# Altium PCB DC-UPS-v1.0.PcbDoc (part 4 of 8)
Units mil, origin at the board's own origin, x right, y up, seen from the top; angles counter-clockwise.
Board outline 5905.51 x 3937.01 mil, 4 copper layers (Top Layer, SIG+PWR, SIG+GND, Bottom Layer), stack 62.449 mil thick; 278 components, 138 nets, 716 pads, 780 vias.
Unrouted connection lines stored in the file: 13.
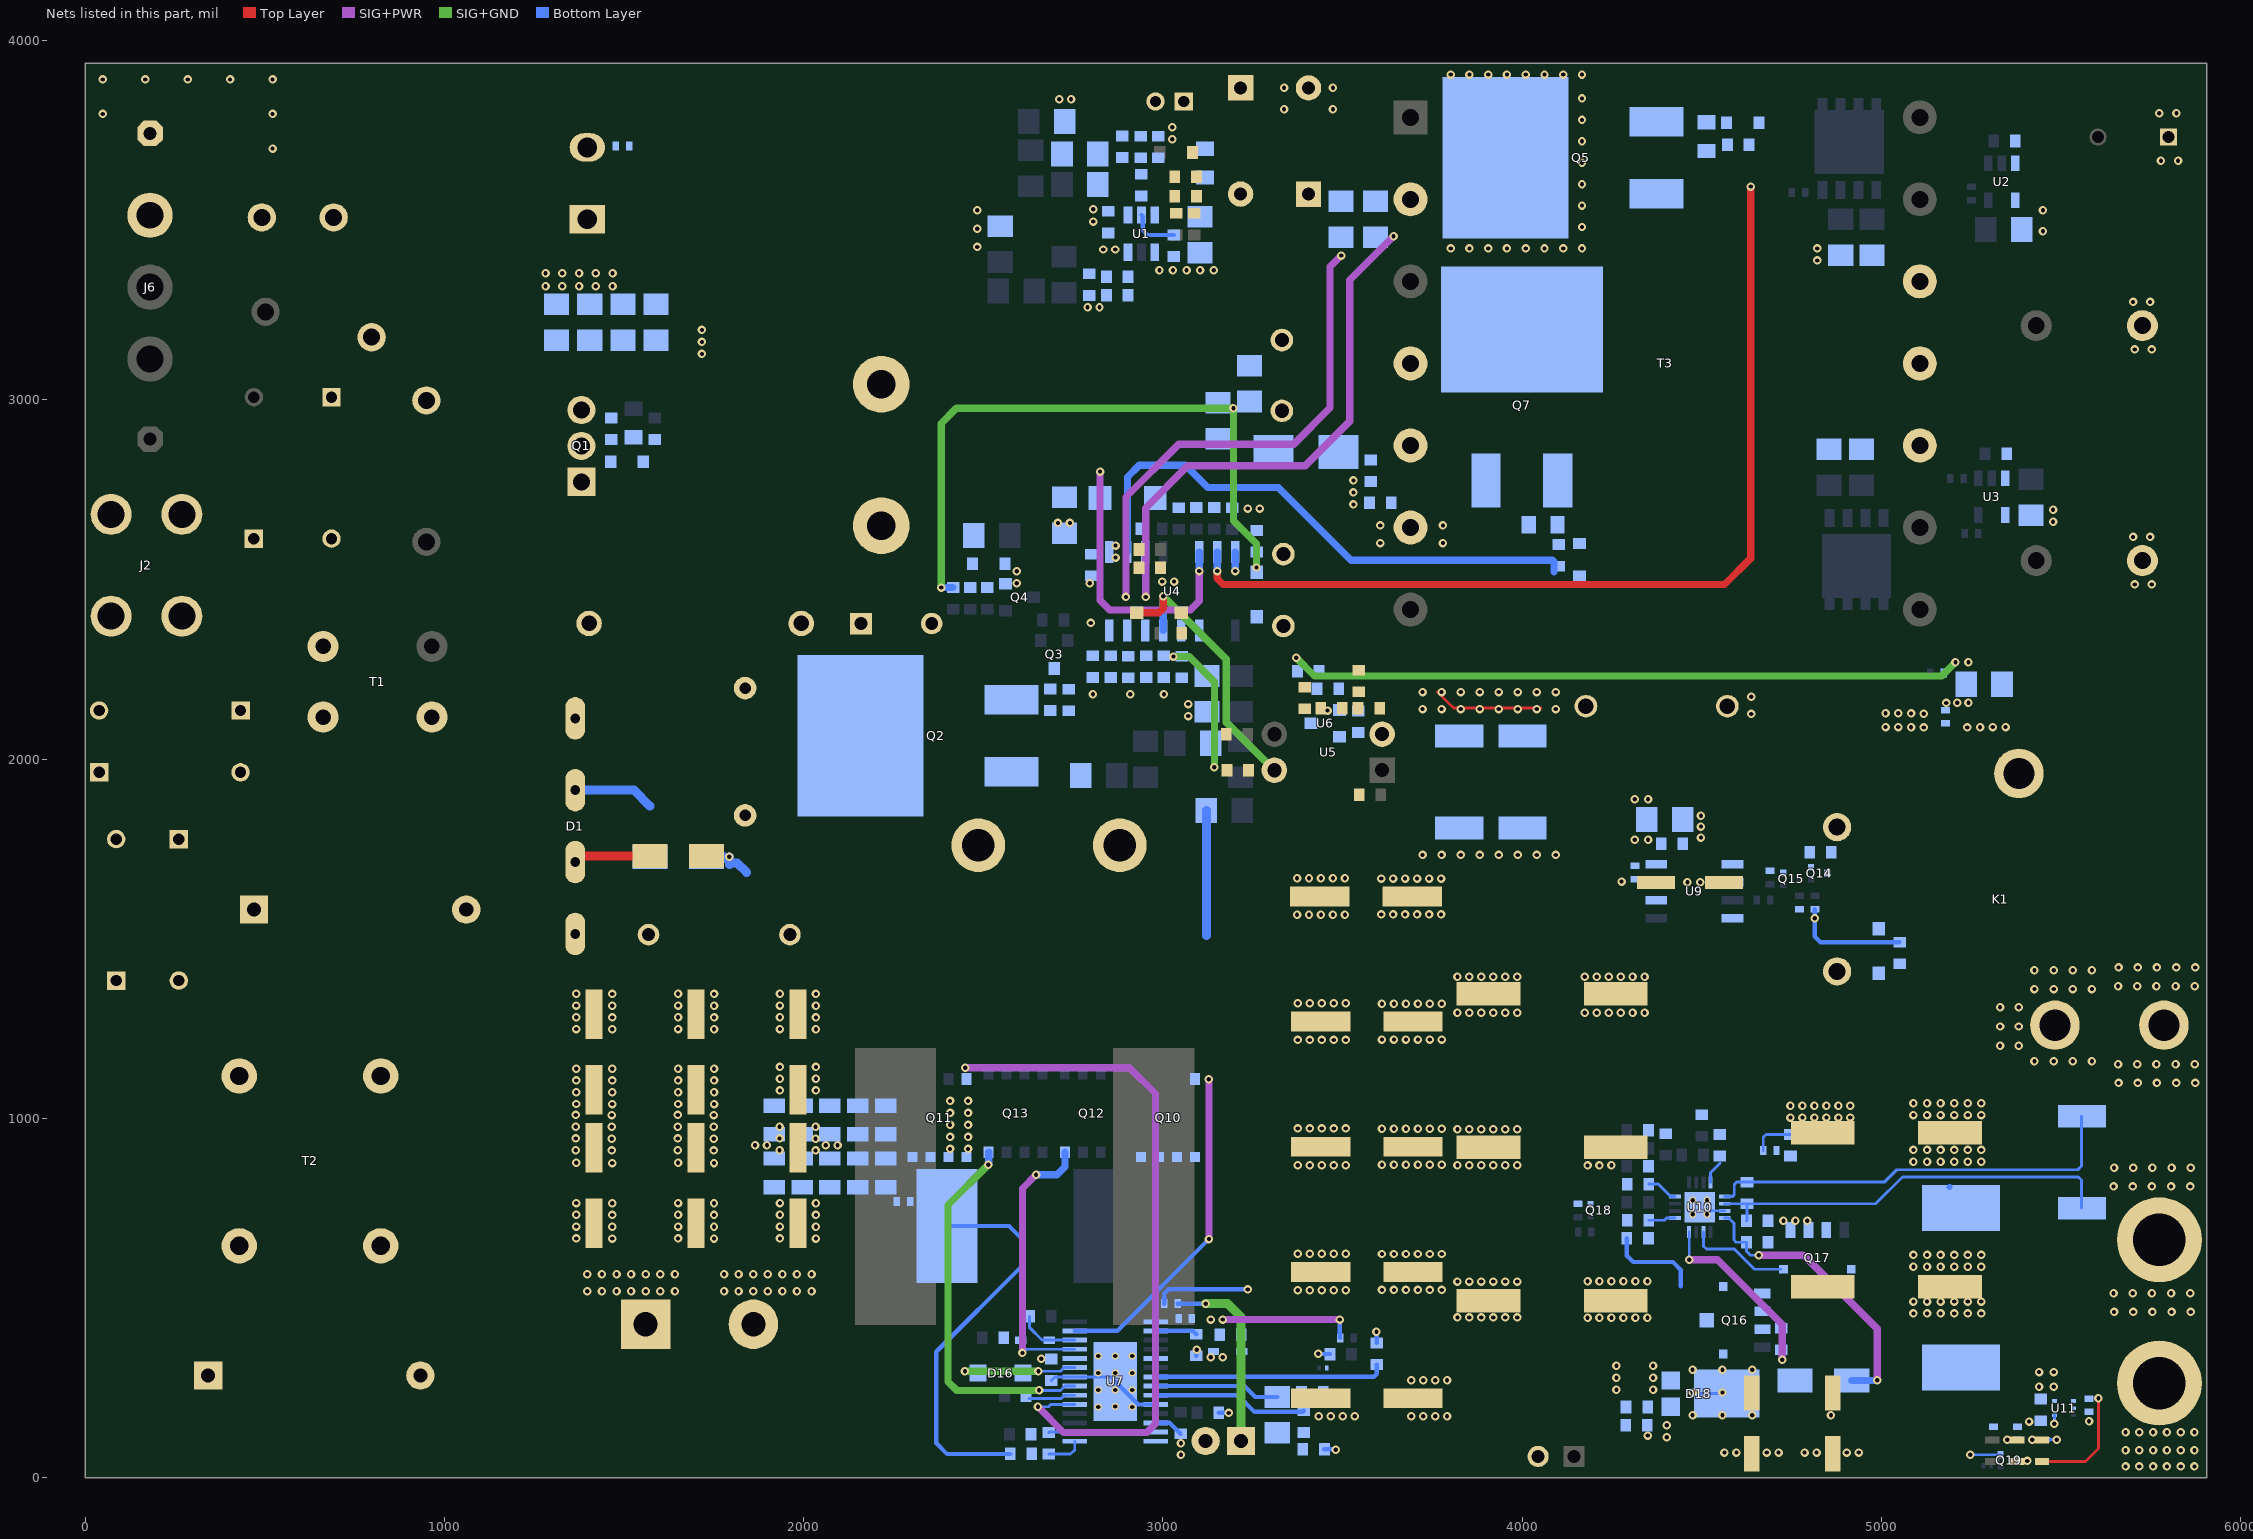
[diagram p4: the nets of this part, all layers, seen from the top]

## Part data (continued)
D5 D6 D8 D9: "100V 1V@10mA 4ns 200mA SOD-323 Switching Diodes ROHS", LCSC Part Number=C668970, Manufacturer=MCC, ComponentLink1Description=https://datasheet.ciiva.com/6367/mmdl914sod-323-6367364.pdf?src-supplier=Digikey, ComponentLink1URL=https://datasheet.ciiva.com/6367/mmdl914sod-323-6367364.pdf?src-supplier=Digikey, ComponentLink2Description=https://datasheet.ciiva.com/24097/mmdl914sod-323-24097719.pdf?src-supplier=Mouser, ComponentLink2URL=https://datasheet.ciiva.com/24097/mmdl914sod-323-24097719.pdf?src-supplier=Mouser, ComponentLink3Description=https://datasheet.ciiva.com/6367/mmdl914sod-323-6367366.pdf?src-supplier=Digikey, ComponentLink3URL=https://datasheet.ciiva.com/6367/mmdl914sod-323-6367366.pdf?src-supplier=Digikey, ComponentLink4Description=https://datasheet.ciiva.com/6367/mmdl914sod-323-6367368.pdf?src-supplier=Digikey, ComponentLink4URL=https://datasheet.ciiva.com/6367/mmdl914sod-323-6367368.pdf?src-supplier=Digikey, Item Type=Diode, Manufacturer Part Number=MMDL914-TP, Pricing="1=0.15, 10=0.108, 100=0.0585, 500=0.04594, 1000=0.03191 (USD)", RoHS=Yes, Stock=172971, Supplier=Digikey
D7: "DIODE GEN PURP 75V 150MA SOD323", Average Rectified Current=150mA, Capacitance=2pF, Forward Current=300mA, Forward Voltage=1.25V, LCSC Part Number=C60580, Manufacturer=Diodes, Max Forward Surge Current (Ifsm)=2A, Max Operating Temperature=150°C, Max Repetitive Reverse Voltage (Vrrm)=75V, Max Reverse Current=1uA, Min Operating Temperature=-65°C, Package Quantity=3000, Power Dissipation=200mW, Supplier Part Number 1=621-1N4148WS-F, Category="Rectifier Diodes", ComponentLink1Description=https://datasheet.ciiva.com/1179/ds30097-1179355.pdf?src-supplier=Element14, ComponentLink1URL=https://datasheet.ciiva.com/1179/ds30097-1179355.pdf?src-supplier=Element14, ComponentLink2Description=https://datasheet.ciiva.com/8300/ds30097-8300396.pdf?src-supplier=Avnet, ComponentLink2URL=https://datasheet.ciiva.com/8300/ds30097-8300396.pdf?src-supplier=Avnet, ComponentLink3Description=https://datasheet.ciiva.com/16199/ds30097-16199061.pdf?src-supplier=Future+Electronics, ComponentLink3URL=https://datasheet.ciiva.com/16199/ds30097-16199061.pdf?src-supplier=Future+Electronics, ComponentLink4Description=https://datasheet.ciiva.com/911/ds30097-911742.pdf?src-supplier=Digi-Key, ComponentLink4URL=https://datasheet.ciiva.com/911/ds30097-911742.pdf?src-supplier=Digi-Key, ComponentLink5Description=https://datasheet.ciiva.com/911/ds30097-911743.pdf?src-supplier=Digi-Key, ComponentLink5URL=https://datasheet.ciiva.com/911/ds30097-911743.pdf?src-supplier=Digi-Key, ComponentLink6Description=https://datasheet.ciiva.com/911/ds30097-911741.pdf?src-supplier=Digi-Key, ComponentLink6URL=https://datasheet.ciiva.com/911/ds30097-911741.pdf?src-supplier=Digi-Key, Contact Plating=Tin,Matte, Current Rating=150mA, Element Configuration=Single, Height=1mm, Item Type=Diode, Lead Free="Lead Free", Length=1.8mm, Manufacturer Part Number=1N4148WS-7-F, Max Reverse Voltage (DC)=75V, Max Surge Current=2A, Mount="Surface Mount", Number of Pins=2, Output Current=150mA, Packaging="Tape and Reel", Peak Non-Repetitive Surge Current=2A, Polarity=Standard, Power Rating=200mW, Pricing 1="1=0.19000, 10=0.17500, 50=0.17500, 100=0.09600, 500=0.05900, 1000=0.04000, 3000=0.03000, 9000=0.02600, 10000=0.02600, 24000=0.02300, 45000=0.01900 (USD)", Radiation Hardening=No, REACH SVHC="No SVHC", Recovery Time=4ns, Reverse Recovery Time=4ns, Reverse Recovery Time-Max=4ns, RoHS=Yes, RoHS Compliant=Yes, Series=-, Supplier 1=Mouser, Voltage=75V, Voltage Rating (DC)=75V, Weight=0.000173oz, Width=1.4mm
D10: "DIODE SCHOTTKY 60V 1A SMB", Average Rectified Current=1A, Case/Package=SMB, LCSC Part Number=C5268303, Manufacturer=STMicroelectronics, Max Reverse Voltage (DC)=60V, Package Quantity=1, ComponentLink1Description=https://datasheet.ciiva.com/6380/dm00058656-6380741.pdf?src-supplier=Digikey, ComponentLink1URL=https://datasheet.ciiva.com/6380/dm00058656-6380741.pdf?src-supplier=Digikey, Item Type=Diode, Manufacturer Part Number=STPS160UY, Mounting Technology="Surface Mount", Packaging="Tape and Reel", Pricing="1=0.46, 10=0.458, 50=0.458, 100=0.458, 1000=0.314, 10000=0.107 (USD)", RoHS=Yes, RoHS Compliant=Yes, Series=-, Stock=2181, Supplier=Mouser
D11: "DIODE ZENER 6.2V 500MW SOD123", Manufacturer=Diodes, Power Rating=500mW, Supplier Part Number=4181776, Voltage Rating (DC)=6.2V, Category="Zener Diodes", ComponentLink1Description=https://datasheet.ciiva.com/15142/getdatasheetpartid-61110-15142283.pdf?src-supplier=Verical, ComponentLink1URL=https://datasheet.ciiva.com/15142/getdatasheetpartid-61110-15142283.pdf?src-supplier=Verical, ComponentLink2Description=https://datasheet.ciiva.com/27052/1541132-27052413.pdf?src-supplier=Jameco, ComponentLink2URL=https://datasheet.ciiva.com/27052/1541132-27052413.pdf?src-supplier=Jameco, ComponentLink3Description=https://datasheet.ciiva.com/890/ds18010-890520.pdf?src-supplier=Digikey, ComponentLink3URL=https://datasheet.ciiva.com/890/ds18010-890520.pdf?src-supplier=Digikey, ComponentLink4Description=https://datasheet.ciiva.com/890/ds18010-890521.pdf?src-supplier=Digikey, ComponentLink4URL=https://datasheet.ciiva.com/890/ds18010-890521.pdf?src-supplier=Digikey, ComponentLink5Description=https://datasheet.ciiva.com/890/ds18010-890522.pdf?src-supplier=Digikey, ComponentLink5URL=https://datasheet.ciiva.com/890/ds18010-890522.pdf?src-supplier=Digikey, Lead Free=5697LeadFree, Manufacturer Part Number=MMSZ5234B-7-F, Pricing="3000=0.0211, 9000=0.0203, 30000=0.0195, 60000=0.0191, 120000=0.0183 (USD)", RoHS=Yes, Stock=81000, Supplier="Future Electronics"
D12: "1.65V@1A 35ns Independent Type 1A 600V DO-214AD Fast Recovery / High Efficiency Diodes ROHS", LCSC Part Number=C328590, Manufacturer="Foshan Blue Rocket Elec", Package=DO-214AD, ComponentLink1Description=LCSC, ComponentLink1URL=https://www.lcsc.com/product-detail/Fast-recovery-high-efficiency-diode_Foshan-Blue-Rocket-Elec-ES1JF_C328590.html, Item Type=Diode, Manufacturer Part Number=ES1JF
D13 D17: "DIODE GEN PURP 100V 300MA SOD123", Average Rectified Current=300mA, Current Rating=150mA, Forward Voltage=1.25V, LCSC Part Number=C83528, Manufacturer=Diodes, Max Forward Surge Current (Ifsm)=2A, Max Operating Temperature=150°C, Max Repetitive Reverse Voltage (Vrrm)=100V, Max Reverse Current=1uA, Min Operating Temperature=-65°C, Package Quantity=3000, Power Dissipation=400mW, Supplier Part Number 1=7634694, Voltage Rating (DC)=75V, Category="Rectifier Diodes", ComponentLink1Description=https://datasheet.ciiva.com/1179/1915529-1179304.pdf?src-supplier=Element14, ComponentLink1URL=https://datasheet.ciiva.com/1179/1915529-1179304.pdf?src-supplier=Element14, ComponentLink2Description=https://datasheet.ciiva.com/22695/1915529-22695239.pdf?src-supplier=Element14, ComponentLink2URL=https://datasheet.ciiva.com/22695/1915529-22695239.pdf?src-supplier=Element14, ComponentLink3Description=https://datasheet.ciiva.com/8300/ds30086-8300392.pdf?src-supplier=Avnet, ComponentLink3URL=https://datasheet.ciiva.com/8300/ds30086-8300392.pdf?src-supplier=Avnet, ComponentLink4Description=https://datasheet.ciiva.com/15219/getdatasheetpartid-110030-15219548.pdf?src-supplier=Verical, ComponentLink4URL=https://datasheet.ciiva.com/15219/getdatasheetpartid-110030-15219548.pdf?src-supplier=Verical, ComponentLink5Description=https://datasheet.ciiva.com/8303/ds30086-8303197.pdf?src-supplier=Avnet, ComponentLink5URL=https://datasheet.ciiva.com/8303/ds30086-8303197.pdf?src-supplier=Avnet, ComponentLink6Description=https://datasheet.ciiva.com/911/ds30086-911735.pdf?src-supplier=Digi-Key, ComponentLink6URL=https://datasheet.ciiva.com/911/ds30086-911735.pdf?src-supplier=Digi-Key, ComponentLink7Description=https://datasheet.ciiva.com/911/ds30086-911736.pdf?src-supplier=Digi-Key, ComponentLink7URL=https://datasheet.ciiva.com/911/ds30086-911736.pdf?src-supplier=Digi-Key, ComponentLink8Description=https://datasheet.ciiva.com/911/ds30086-911734.pdf?src-supplier=Digi-Key, ComponentLink8URL=https://datasheet.ciiva.com/911/ds30086-911734.pdf?src-supplier=Digi-Key, ComponentLink9Description=https://datasheet.ciiva.com/4435/ds30086-4435128.pdf?src-supplier=Mouser, ComponentLink9URL=https://datasheet.ciiva.com/4435/ds30086-4435128.pdf?src-supplier=Mouser, Contact Plating=Tin,Matte, Element Configuration=Single, Forward Current=150mA, Height=1.25mm, Item Type=Diode, Lead Free="Lead Free", Length=2.85mm, Manufacturer Part Number=1N4148W-7-F, Max Reverse Voltage (DC)=100V, Max Surge Current=2A, Mounting Technology="Surface Mount", Output Current=150mA, Packaging="Tape and Reel", Peak Non-Repetitive Surge Current=2A, Pins=2, Polarity=Standard, Power Rating=400mW, Pricing 1="3000=0.01840, 12000=0.01760, 45000=0.01690, 120000=0.01640, 300000=0.01560 (USD)", Radiation Hardening=No, Reach SVHC Compliant=Yes, Recovery Time=4ns, Reverse Recovery Time=4ns, Reverse Recovery Time-Max=4ns, RoHS=Yes, RoHS Compliant=Yes, Series=-, Stock 1=32931000, Supplier 1="Future Electronics", Voltage=100V, Weight=0.000353oz, Width=1.7mm
D14 D15: "35V Independent Type 500mV@200mA 200mA SOD-523F Schottky Diodes ROHS", LCSC Part Number=C3012739, Manufacturer=Comchip, ComponentLink1Description=http://www.mouser.com/ds/2/80/CDBUR0230L-RevB718340-56369.pdf?src-supplier=Mouser, ComponentLink1URL=http://www.mouser.com/ds/2/80/CDBUR0230L-RevB718340-56369.pdf?src-supplier=Mouser, Item Type=Diode, Manufacturer Part Number=CDBUR0230L-HF, Pricing="1=0.38, 10=0.263, 50=0.263, 100=0.133, 1000=0.081, 10000=0.055 (USD)", RoHS=Yes, RoHS Compliant=Yes, Stock=3840, Supplier=Mouser
D16: "20V 385mV@0.5A 500mA SOD-123 Schottky Diodes ROHS", LCSC Part Number=C22439176, Manufacturer=SINEDEVICE, Package=SOD-123, ComponentLink1Description=LCSC, ComponentLink1URL=https://www.lcsc.com/product-detail/Schottky-Diodes_SINEDEVICE-B0520W_C22439176.html, Item Type=Diode, Manufacturer Part Number=B0520W
D18: "45V Independent Type 20A 470mV@20A TO-277 Schottky Diodes ROHS", LCSC Part Number=C840773, Manufacturer=MDD, Package=TO-277, ComponentLink1Description=LCSC, ComponentLink1URL=https://www.lcsc.com/product-detail/Schottky-Diodes_MDD-Microdiode-Semiconductor-ST2045_C840773.html, Item Type=Diode, Manufacturer Part Number=ST2045
D19: "40V 500mV@2A 2A SMA(DO-214AC) Schottky Barrier Diodes (SBD) ROHS", LCSC Part Number=C2886579, Manufacturer="Guangdong Hottech", Package=SMA(DO-214AC), ComponentLink1Description=LCSC, ComponentLink1URL=https://www.lcsc.com/product-detail/Schottky-Barrier-Diodes-SBD_Guangdong-Hottech-SS24A_C2886579.html, Manufacturer Part Number=SS24A
F1: "FUSE BOARD MNT 5A 250VAC RADIAL", LCSC Part Number=C142820, Manufacturer="Littelfuse Wickmann", ComponentLink1Description=https://datasheet.ciiva.com/299/littelfuse-fuse-372-299190.pdf?src-supplier=Digikey, ComponentLink1URL=https://datasheet.ciiva.com/299/littelfuse-fuse-372-299190.pdf?src-supplier=Digikey, ComponentLink2Description=https://datasheet.ciiva.com/16298/littelfuse-fuse-372-16298798.pdf?src-supplier=Future+Electronics, ComponentLink2URL=https://datasheet.ciiva.com/16298/littelfuse-fuse-372-16298798.pdf?src-supplier=Future+Electronics, Item Type=Fuses, Manufacturer Part Number=37215000001, Pricing="1=0.96, 5=0.928, 10=0.869, 50=0.7192, 100=0.5993, 250=0.58436, 500=0.49446 (USD)", RoHS=Yes, Stock=2122, Supplier=Digikey
J2: "M4 Plugin PCB Welding Terminal ROHS", Manufacturer=XFCN, Package=Plugin, ComponentLink1Description=LCSC, Manufacturer Part Number=T44001
J4: "Gold 250V 3A Straight Square Pins 2.5mm 2P 260℃ 6mm -40℃~+105℃ 3mm 2.54mm Plugin Black Brass 1x2P Plugin,P=2.54mm Pin Headers ROHS", LCSC Part Number=C706874, Manufacturer=XKB, Package=Plugin,P=2.54mm, ComponentLink1Description=LCSC, ComponentLink1URL=https://www.lcsc.com/product-detail/Pin-Headers_XKB-Connectivity-X6511WV-02H-C60D30_C706874.html, Item Type="Male Header", Manufacturer Part Number=X6511WV-02H-C60D30
J5: "Conn Shrouded Header (4 Sides) HDR 2 POS 2.5mm Solder ST Thru-Hole Box", Color=Natural, Contact Resistance=20mR, Current Rating=3A, Housing Color=White, Insulation Resistance=1GR, LCSC Part Number=C158012, Manufacturer=JST, Max Operating Temperature=85°C, Max Voltage Rating (AC)=250V, Min Operating Temperature=-25°C, Supplier Part Number 1=1516276, Category="FFC / FPC", ComponentLink1Description=https://datasheet.ciiva.com/26894/getdatasheetpartid-640357-26894434.pdf?src-supplier=Verical, ComponentLink1URL=https://datasheet.ciiva.com/26894/getdatasheetpartid-640357-26894434.pdf?src-supplier=Verical, ComponentLink2Description=https://datasheet.ciiva.com/11746/0900766b8082653e-11746979.pdf?src-supplier=RSComponents, ComponentLink2URL=https://datasheet.ciiva.com/11746/0900766b8082653e-11746979.pdf?src-supplier=RSComponents, ComponentLink3Description=https://datasheet.ciiva.com/26894/getdatasheetpartid-385291-26894760.pdf?src-supplier=Verical, ComponentLink3URL=https://datasheet.ciiva.com/26894/getdatasheetpartid-385291-26894760.pdf?src-supplier=Verical, ComponentLink4Description=https://datasheet.ciiva.com/8052/5448-8052024.pdf?src-supplier=Element14, ComponentLink4URL=https://datasheet.ciiva.com/8052/5448-8052024.pdf?src-supplier=Element14, ComponentLink5Description=https://datasheet.ciiva.com/20207/523653-20207167.pdf?src-supplier=Rapid+Electronics, ComponentLink5URL=https://datasheet.ciiva.com/20207/523653-20207167.pdf?src-supplier=Rapid+Electronics, Connector Type="Male Pin", Contact Material=Brass, Contact Plating=Tin,Copper,Lead, Depth=5.75mm, Fastening Type=Detent, Housing Material=Polyamide, Item Type="JST Connector", Lead Free="Lead Free", Lead Pitch=2.5mm, Length=7.4mm, Manufacturer Part Number=B2B-XH-A(LF)(SN), Max Current Rating=3A, Max Voltage Rating (DC)=250V, Mount="Through Hole", Number of Contacts=2, Number of Positions=2, Number of Rows=1, Orientation=Straight, Packaging=Bulk, Pitch=2.5mm, Pricing 1="100=0.06860, 1000=0.04800, 2500=0.04520, 5000=0.04230, 10000=0.03950, 20000=0.03660 (GBP)", REACH SVHC="No SVHC", RoHS=Yes, Stock 1=219240, Supplier 1=Farnell, Termination=Solder, Voltage Rating=250V, Voltage Rating (AC)=250V, Wire/Cable Gauge=22AWG
J6: "1x3P 3P 1 Tin 5.08mm 3 Brass 10A Direct Insert Plugin,P=5.08mm Wire To Board Connector ROHS", LCSC Part Number=C706974, Manufacturer="XKB Connection", Package=Plugin,P=5.08mm, ComponentLink1Description=LCSC, ComponentLink1URL=https://www.lcsc.com/product-detail/Wire-To-Board-Connector_XKB-Connection-X5050WV-03-N2SN_C706974.html, Item Type="Wire To Board Connector", Manufacturer Part Number=X5050WV-03-N2SN
J7: "1x2P Corner With Cover Plate 2 1 7.62mm -40℃~+105℃ 20A 300V Black 12~22 Straight Needle Plugin,P=7.62mm Barrier Terminal Blocks ROHS", LCSC Part Number=C496127, Manufacturer=DORABO, Package=Plugin,P=7.62mm, ComponentLink1Description=LCSC, ComponentLink1URL=https://www.lcsc.com/product-detail/Barrier-Terminal-Blocks_DORABO-DBT50G-7-62-2P-BK-P_C496127.html, Item Type="Terminal Block", Manufacturer Part Number=DBT50G-7.62-2P-BK-P
K1: "12V 40A One Conversion: 1C (SPDT-Conversion) Plugin,27.2x32mm Power Relays ROHS", LCSC Part Number=C396903, Manufacturer=NBC, Item Type=Relays, Manufacturer Part Number=NB90-12S-S-C, RoHS=No, Supplier=LCSC
L1: library part FC-PFC1060-850M-B-L, "20A 85uH ±15% 10A Plugin,D=35mm Power Inductors ROHS", LCSC Part Number=C22461812, Manufacturer=FANGCHENG, Package=Plugin,D=35mm, ComponentLink1Description=LCSC, ComponentLink1URL=https://www.lcsc.com/product-detail/Power-Inductors_FANGCHENG-FC-PFC1060-850M-B-L_C22461812.html, Item Type=Inductor, Manufacturer Part Number=FC-PFC1060-850M-B-L
L2: library part 7447021, "FIXED IND 100UH 2A 80 MOHM TH", Manufacturer="Wurth Electronics", Supplier Part Number=710-7447021, ComponentLink1Description=https://datasheet.ciiva.com/11796/0900766b804e2e89-11796539.pdf?src-supplier=Rs, ComponentLink1URL=https://datasheet.ciiva.com/11796/0900766b804e2e89-11796539.pdf?src-supplier=Rs, ComponentLink2Description=https://datasheet.ciiva.com/6693/7447021-6693538.pdf?src-supplier=Digikey, ComponentLink2URL=https://datasheet.ciiva.com/6693/7447021-6693538.pdf?src-supplier=Digikey, ComponentLink3Description=https://datasheet.ciiva.com/14101/pk7447021-data-de-14101850.pdf?src-supplier=Distrelec, ComponentLink3URL=https://datasheet.ciiva.com/14101/pk7447021-data-de-14101850.pdf?src-supplier=Distrelec, ComponentLink4Description=https://datasheet.ciiva.com/7695/7447021-7695676.pdf?src-supplier=Element14, ComponentLink4URL=https://datasheet.ciiva.com/7695/7447021-7695676.pdf?src-supplier=Element14, ComponentLink5Description=https://datasheet.ciiva.com/48691/001087627-da-01-ml-we-fi-funkentstoerdrossel-7447021-de-en-48691575.pdf?src-supplier=Conrad, ComponentLink5URL=https://datasheet.ciiva.com/48691/001087627-da-01-ml-we-fi-funkentstoerdrossel-7447021-de-en-48691575.pdf?src-supplier=Conrad, Item Type=Inductors, Manufacturer Part Number=7447021, Pricing="1=1.93, 10=1.83, 50=1.71, 100=1.61, 1000=1.46, 10000=1.46 (USD)", RoHS=Yes, Stock=1392, Supplier=Mouser
L3: library part FXL2213-1R0-M, "60A 1uH ±20% 60A SMD,23.5x22mm Power Inductors ROHS", LCSC Part Number=C22378751, Manufacturer=cjiang, Package=SMD,23.5x22mm, ComponentLink1Description=LCSC, ComponentLink1URL=https://www.lcsc.com/product-detail/Power-Inductors_cjiang-Changjiang-Microelectronics-Tech-FXL2213-1R0-M_C22378751.html, Item Type=Inductors, Manufacturer Part Number=FXL2213-1R0-M
L4: library part FAUL1350-1R5MT, "23A 1.5uH Integrated molded inductor ±20% 33A SMD,12.6x13.5mm Power Inductors ROHS", LCSC Part Number=C5298318, Manufacturer=cjiang, Package=SMD,12.6x13.5mm, ComponentLink1Description=LCSC, ComponentLink1URL=https://www.lcsc.com/product-detail/Power-Inductors_cjiang-Changjiang-Microelectronics-Tech-FAUL1350-1R5MT_C5298318.html, Item Type=Inductors, Manufacturer Part Number=FAUL1350-1R5MT
LED1: library part NCD0603R3, "RED LED 0603 Light Emitting Diodes", LCSC Part Number=C3151730, Manufacturer="Foshan NationStar Optoelectronics", Package=0603, ComponentLink1Description=LCSC, ComponentLink1URL=https://www.lcsc.com/product-detail/Light-Emitting-Diodes-LED_Foshan-NationStar-Optoelectronics-NCD0603R3_C3151730.html, Item Type=LED, Manufacturer Part Number=NCD0603R3
LED2: library part NCD0603G2, "Emerald 0603 Light Emitting Diodes (LED) ROHS", LCSC Part Number=C87326, Manufacturer="Foshan NationStar Optoelectronics", Package=0603, ComponentLink1Description=LCSC, ComponentLink1URL=https://www.lcsc.com/product-detail/Light-Emitting-Diodes-LED_Foshan-NationStar-Optoelectronics-NCD0603G2_C87326.html, Item Type=LED, Manufacturer Part Number=NCD0603G2
LED3: "20mA 100mcd~220mcd 600nm~610nm -30℃~+85℃ Orange 130° 65mW 1.6V~2.6V 0603 Light Emitting Diodes (LED) ROHS", LCSC Part Number=C108553, Manufacturer="FOSHAN Nationstar Optoelectronics", Item Type=LED, Manufacturer Part Number=NCD0603O2, RoHS=No, Supplier=LCSC
NT1 NT2 NT3 NT4: "Net Tie SMD", Manufacturer Part Number="Net Tie", Item Type="Net Tie Pad"
Q1: "MOSFET N-CH 600V 31A TO220-3", LCSC Part Number=C672383, Manufacturer=Infineon, ComponentLink1Description=https://www.infineon.com/dgdl/Infineon-IPP60R099P7-DS-v02_00-EN.pdf?fileId=5546d4625b10283a015b1979a00e4aaa&src-supplier=Digikey, ComponentLink1URL=https://www.infineon.com/dgdl/Infineon-IPP60R099P7-DS-v02_00-EN.pdf?fileId=5546d4625b10283a015b1979a00e4aaa&src-supplier=Digikey, ComponentLink2Description=https://datasheet.octopart.com/IPP60R099P7XKSA1-Infineon-datasheet-96921537.pdf?src-supplier=TME, ComponentLink2URL=https://datasheet.octopart.com/IPP60R099P7XKSA1-Infineon-datasheet-96921537.pdf?src-supplier=TME, Item Type=MOSFET, Manufacturer Part Number=IPP60R099P7XKSA1, Pricing="1=4.15, 10=3.48, 50=3.29, 100=2.82, 1000=2.14, 10000=2.02 (USD)", RoHS=Yes, Stock=311, Supplier=Mouser
Q2: "650V 190mΩ@10V 3.5V 1PCSNChannel TO-263 MOSFETs ROHS", LCSC Part Number=C7569064, Manufacturer="VBsemi Elec", Package=TO-263, ComponentLink1Description=LCSC, ComponentLink1URL=https://www.lcsc.com/product-detail/MOSFETs_VBsemi-Elec-STB24NM60N-VB_C7569064.html, Item Type=MOSFET, Manufacturer Part Number=STB24NM60N-VB
Q3: "MOSFET P-CH 60V 1.6A SOT23-3", Case/Package=SOT-23-3, Continuous Drain Current (ID)=1.2A, Drain to Source Resistance=345mR, Drain to Source Voltage (Vdss)=60V, Gate to Source Voltage (Vgs)=20V, Input Capacitance=210pF, LCSC Part Number=C553975, Manufacturer="Vishay Siliconix", Max Operating Temperature=150°C, Max Power Dissipation=1.7W, Min Operating Temperature=-55°C, Package Quantity=3000, Power Dissipation=1W, Threshold Voltage=-1V, ComponentLink1Description=https://datasheet.ciiva.com/16217/si2309cd-16217597.pdf?src-supplier=Future+Electronics, ComponentLink1URL=https://datasheet.ciiva.com/16217/si2309cd-16217597.pdf?src-supplier=Future+Electronics, ComponentLink2Description=https://datasheet.ciiva.com/29742/si2309cd-29742879.pdf?src-supplier=Digikey, ComponentLink2URL=https://datasheet.ciiva.com/29742/si2309cd-29742879.pdf?src-supplier=Digikey, Drain-source On Resistance-Max=345mR, Fall Time=35ns, Height=1.02mm, Item Type=MOSFETs, Lead Free="Lead Free", Length=3.04mm, Manufacturer Part Number=SI2309CDS-T1-E3, Mounting Technology="Surface Mount", Number of Channels=1, Packaging="Tape and Reel", Pins=3, Polarity=P-CHANNEL, Pricing="1=0.53, 10=0.453, 50=0.453, 100=0.316, 1000=0.2, 10000=0.157 (USD)", Radiation Hardening=No, Rds On Max=345mR, Rise Time=35ns, RoHS=Yes, RoHS Compliant=Yes, Series=TrenchFET®, Stock=57582, Supplier=Mouser, Turn-Off Delay Time=15ns, Turn-On Delay Time=40ns, Weight=0.050717oz, Width=1.4mm
Q4: "TRANS NPN 40V 0.6A SOT23-3", LCSC Part Number=C151826, Manufacturer=Diodes, ComponentLink1Description=https://datasheet.ciiva.com/15139/getdatasheetpartid-91436-15139165.pdf?src-supplier=Verical, ComponentLink1URL=https://datasheet.ciiva.com/15139/getdatasheetpartid-91436-15139165.pdf?src-supplier=Verical, ComponentLink2Description=https://datasheet.ciiva.com/972/ds30039-972547.pdf?src-supplier=Digikey, ComponentLink2URL=https://datasheet.ciiva.com/972/ds30039-972547.pdf?src-supplier=Digikey, ComponentLink3Description=https://datasheet.ciiva.com/972/ds30039-972548.pdf?src-supplier=Digikey, ComponentLink3URL=https://datasheet.ciiva.com/972/ds30039-972548.pdf?src-supplier=Digikey, ComponentLink4Description=https://datasheet.ciiva.com/972/ds30039-972549.pdf?src-supplier=Digikey, ComponentLink4URL=https://datasheet.ciiva.com/972/ds30039-972549.pdf?src-supplier=Digikey, ComponentLink5Description=https://datasheet.ciiva.com/11201/ds30039-11201820.pdf?src-supplier=Avnet, ComponentLink5URL=https://datasheet.ciiva.com/11201/ds30039-11201820.pdf?src-supplier=Avnet, ComponentLink6Description=https://datasheet.ciiva.com/16199/ds30039-16199054.pdf?src-supplier=Future+Electronics, ComponentLink6URL=https://datasheet.ciiva.com/16199/ds30039-16199054.pdf?src-supplier=Future+Electronics, Item Type=BJTs, Manufacturer Part Number=MMBT4401-7-F, Pricing="3000=0.0119, 12000=0.0113, 30000=0.011, 75000=0.0107, 120000=0.0102 (USD)", RoHS=Yes, Stock=1359000, Supplier="Future Electronics"
Q5 Q7: "MOSFET N-CH 800V 21A D2PAK", LCSC Part Number=C3277647, Manufacturer=Vishay, Item Type=MOSFET, Manufacturer Part Number=SIHB24N80AE-GE3, Pricing="1=3.16, 10=2.93, 50=2.71, 100=2.32, 1000=1.66, 10000=1.59 (USD)", RoHS=No, Stock=457, Supplier=Mouser
Q6 Q9: "MOSFET N-CH 80V 100A 8VSON", LCSC Part Number=C2864118, Manufacturer="Texas Instruments", Package="8-VSON-CLIP (5x6)", ComponentLink1Description=LCSC, ComponentLink1URL=https://jlcpcb.com/partdetail/TexasInstruments-CSD19502Q5B/C2864118, Item Type=Mosfet, Manufacturer Part Number=CSD19502Q5B
Q10: "MOSFET N-CH 40V 159A 8VSON", LCSC Part Number=C701747, Manufacturer="Texas Instruments", ComponentLink1Description=http://www.ti.com/general/docs/suppproductinfo.tsp?distId=10&amp;gotoUrl=http%3A%2F%2Fwww.ti.com%2Flit%2Fgpn%2Fcsd18511q5a&src-supplier=Digikey, ComponentLink1URL=http://www.ti.com/general/docs/suppproductinfo.tsp?distId=10&amp;gotoUrl=http%3A%2F%2Fwww.ti.com%2Flit%2Fgpn%2Fcsd18511q5a&src-supplier=Digikey, ComponentLink2Description=http://www.ti.com/lit/ds/symlink/csd18511q5a.pdf?src-supplier=Digikey, ComponentLink2URL=http://www.ti.com/lit/ds/symlink/csd18511q5a.pdf?src-supplier=Digikey, Item Type=IC, Manufacturer Part Number=CSD18511Q5A, Pricing="1=1.08, 10=0.885, 50=0.885, 100=0.688, 1000=0.475, 10000=0.416 (USD)", RoHS=Yes, Stock=1551, Supplier=Mouser
Q11 Q13: "MOSFET N-CH 100V 100A 8VSON", Case/Package=SON, Continuous Drain Current (ID)=100A, Drain to Source Breakdown Voltage=100V, Drain to Source Resistance=8.7mR, Gate to Source Voltage (Vgs)=20V, Input Capacitance=2.67nF, LCSC Part Number=C110197, Manufacturer="Texas Instruments", Max Operating Temperature=150°C, Max Power Dissipation=3.2W, Min Operating Temperature=-55°C, Package Quantity=2500, Threshold Voltage=2.8V, ComponentLink1Description=https://datasheet.ciiva.com/29752/csd19533q5a-29752194.pdf?src-supplier=Digikey, ComponentLink1URL=https://datasheet.ciiva.com/29752/csd19533q5a-29752194.pdf?src-supplier=Digikey, ComponentLink2Description=https://datasheet.ciiva.com/46430/1824682-46430379.pdf?src-supplier=Element14, ComponentLink2URL=https://datasheet.ciiva.com/46430/1824682-46430379.pdf?src-supplier=Element14, ComponentLink3Description=https://datasheet.ciiva.com/29752/csd19533q5a-29752206.pdf?src-supplier=Digikey, ComponentLink3URL=https://datasheet.ciiva.com/29752/csd19533q5a-29752206.pdf?src-supplier=Digikey, ComponentLink4Description=https://datasheet.ciiva.com/30021/csd19533q5a-30021948.pdf?src-supplier=Avnet, ComponentLink4URL=https://datasheet.ciiva.com/30021/csd19533q5a-30021948.pdf?src-supplier=Avnet, Contact Plating=Tin, Drain to Source Voltage (Vdss)=100V, Element Configuration=Single, Fall Time=5ns, Item Type=MOSFETs, Lead Free="Contains Lead", Manufacturer Part Number=CSD19533Q5A, Mounting Technology="Surface Mount", Number of Channels=1, Number of Elements=1, Packaging="Tape and Reel", Pins=8, Polarity=N-CHANNEL, Power Dissipation=3.2W, Pricing="1=1.43, 10=1.17, 50=1.17, 100=0.907, 1000=0.626, 10000=0.535 (USD)", Rds On Max=9.4mR, Reach SVHC Compliant=No, Rise Time=6ns, RoHS=Yes, RoHS Compliant=Yes, Series=NexFET™, Stock=14779, Supplier=Mouser, Turn-Off Delay Time=16ns, Turn-On Delay Time=6ns
Q12: "MOSFET N-CH 60V 19A/100A 8VSON", LCSC Part Number=C2683366, Manufacturer="Texas Instruments", ComponentLink1Description=https://datasheet.ciiva.com/6386/csd18531q5a-6386406.pdf?src-supplier=Digikey, ComponentLink1URL=https://datasheet.ciiva.com/6386/csd18531q5a-6386406.pdf?src-supplier=Digikey, ComponentLink2Description=https://datasheet.ciiva.com/13063/csd18531q5a-108247-13063440.pdf?src-supplier=Mouser, ComponentLink2URL=https://datasheet.ciiva.com/13063/csd18531q5a-108247-13063440.pdf?src-supplier=Mouser, ComponentLink3Description=https://datasheet.ciiva.com/23868/1762944-23868000.pdf?src-supplier=Newark, ComponentLink3URL=https://datasheet.ciiva.com/23868/1762944-23868000.pdf?src-supplier=Newark, ComponentLink4Description=https://datasheet.ciiva.com/14192/slps321b-14192915.pdf?src-supplier=Avnet, ComponentLink4URL=https://datasheet.ciiva.com/14192/slps321b-14192915.pdf?src-supplier=Avnet, ComponentLink5Description=https://datasheet.ciiva.com/22712/1733500-22712609.pdf?src-supplier=Element14, ComponentLink5URL=https://datasheet.ciiva.com/22712/1733500-22712609.pdf?src-supplier=Element14, ComponentLink6Description=https://datasheet.ciiva.com/6386/csd18531q5a-6386407.pdf?src-supplier=Digikey, ComponentLink6URL=https://datasheet.ciiva.com/6386/csd18531q5a-6386407.pdf?src-supplier=Digikey, ComponentLink7Description=https://datasheet.ciiva.com/6386/csd18531q5a-6386408.pdf?src-supplier=Digikey, ComponentLink7URL=https://datasheet.ciiva.com/6386/csd18531q5a-6386408.pdf?src-supplier=Digikey, Item Type=MOSFETs, Manufacturer Part Number=CSD18531Q5A, Number of Channels=1NUMBER, Pricing="1=1.48, 10=1.22, 50=1.22, 100=0.944, 1000=0.652, 10000=0.558 (USD)", RoHS=Yes, Stock=2842, Supplier=Mouser, Thickness=1mm
Q14 Q15 Q18 Q19: "40V 100mW 100@10mA,1V 200mA 300MHz 300mV@50mA,5mA NPN -55℃~+150℃@(Tj) SOT-723 Bipolar Transistors - BJT ROHS", LCSC Part Number=C2923360, Manufacturer="TECH PUBLIC", Package=SOT-723, ComponentLink1Description=LCSC, ComponentLink1URL=https://www.lcsc.com/product-detail/Bipolar-Transistors-BJT_TECH-PUBLIC-MMBT3904M_C2923360.html, Item Type=Mosfet, Manufacturer Part Number=MMBT3904M
Q16 Q17: "MOSFET N-CH 40V 30A PPAK SO-8", LCSC Part Number=C52893, Manufacturer=Vishay, ComponentLink1Description=https://datasheet.ciiva.com/6387/sir426dp-6387168.pdf?src-supplier=Digikey, ComponentLink1URL=https://datasheet.ciiva.com/6387/sir426dp-6387168.pdf?src-supplier=Digikey, ComponentLink2Description=https://datasheet.ciiva.com/4440/sir426dp-244407-4440641.pdf?src-supplier=Mouser, ComponentLink2URL=https://datasheet.ciiva.com/4440/sir426dp-244407-4440641.pdf?src-supplier=Mouser, ComponentLink3Description=https://datasheet.ciiva.com/28599/1750667-28599683.pdf?src-supplier=Element14, ComponentLink3URL=https://datasheet.ciiva.com/28599/1750667-28599683.pdf?src-supplier=Element14, ComponentLink4Description=https://datasheet.ciiva.com/5774/sir426dp-5774022.pdf?src-supplier=Farnell, ComponentLink4URL=https://datasheet.ciiva.com/5774/sir426dp-5774022.pdf?src-supplier=Farnell, ComponentLink5Description=https://datasheet.ciiva.com/6387/sir426dp-6387166.pdf?src-supplier=Digikey, ComponentLink5URL=https://datasheet.ciiva.com/6387/sir426dp-6387166.pdf?src-supplier=Digikey, ComponentLink6Description=https://datasheet.ciiva.com/11159/sir426dp-11159834.pdf?src-supplier=Avnet, ComponentLink6URL=https://datasheet.ciiva.com/11159/sir426dp-11159834.pdf?src-supplier=Avnet, ComponentLink7Description=https://datasheet.ciiva.com/16486/sir426dp-16486778.pdf?src-supplier=Future+Electronics, ComponentLink7URL=https://datasheet.ciiva.com/16486/sir426dp-16486778.pdf?src-supplier=Future+Electronics, Height=1.12mm, Item Type=MOSFETs, Lead Free=5697LeadFree, Manufacturer Part Number=SIR426DP-T1-GE3, Pricing="1=1, 10=0.818, 50=0.818, 100=0.637, 1000=0.44, 10000=0.375 (USD)", RoHS=Yes, Stock=68474, Supplier=Mouser
R1 R4: library part RC1206FR-073M09L, "RES 3.09M OHM 1% 1/4W 1206", Case Code (Imperial)=1206, Case Code (Metric)=3216, LCSC Part Number=C488771, Manufacturer=Yageo, Max Operating Temperature=155°C, Max Power Dissipation=250mW, Min Operating Temperature=-55°C, Package Quantity=1, Temperature Coefficient=100ppm/°C, Tolerance=1%, Voltage Rating (DC)=200V, Case/Package=1206, ComponentLink1Description=https://datasheet.ciiva.com/2461/pyu-rc1206-51-rohs-l-4-2461290.pdf?src-supplier=Digikey, ComponentLink1URL=https://datasheet.ciiva.com/2461/pyu-rc1206-51-rohs-l-4-2461290.pdf?src-supplier=Digikey, ComponentLink2Description=https://datasheet.ciiva.com/2461/pyu-rc1206-51-rohs-l-4-2461291.pdf?src-supplier=Digikey, ComponentLink2URL=https://datasheet.ciiva.com/2461/pyu-rc1206-51-rohs-l-4-2461291.pdf?src-supplier=Digikey, ComponentLink3Description=https://datasheet.ciiva.com/2461/pyu-rc1206-51-rohs-l-4-2461292.pdf?src-supplier=Digikey, ComponentLink3URL=https://datasheet.ciiva.com/2461/pyu-rc1206-51-rohs-l-4-2461292.pdf?src-supplier=Digikey, Contact Plating=Tin,Matte, Features="Moisture Resistant", Height=0.026inch, Item Type=Resistor, Lead Free="Lead Free", Length=0.122inch, Manufacturer Part Number=RC1206FR-073M09L, Number of Terminations=2, Packaging="Cut Tape", Pricing="1=0.1, 10=0.025, 50=0.025, 100=0.015, 1000=0.013, 10000=0.01 (USD)", RoHS=Yes, RoHS Compliant=Yes, Series=RC, Stock=10394, Supplier=Mouser, Width=0.063inch
R2 R23: library part CRCW080510R0FKEAHP, "RES SMD 10 OHM 1% 1/2W 0805", Case Code (Imperial)=0805, Case Code (Metric)=2012, LCSC Part Number=C844598, Manufacturer=Vishay, Max Operating Temperature=155°C, Max Power Dissipation=333mW, Min Operating Temperature=-55°C, Package Quantity=5000, Power Rating=330mW, Ratings=AEC-Q200, Resistance Tolerance=1%, Resistor Type="Thick Film", Temperature Coefficient=100ppm/°C, Voltage Rating=150V, Case/Package=0805, ComponentLink1Description=http://www.farnell.com/datasheets/2884039.pdf?src-supplier=Newark, ComponentLink1URL=http://www.farnell.com/datasheets/2884039.pdf?src-supplier=Newark, ComponentLink2Description=https://datasheet.octopart.com/CRCW080510R0FKEAHP-Vishay-datasheet-87136057.pdf?src-supplier=Newark, ComponentLink2URL=https://datasheet.octopart.com/CRCW080510R0FKEAHP-Vishay-datasheet-87136057.pdf?src-supplier=Newark, ComponentLink3Description=http://www.vishay.com/docs/20043/crcwhpe3.pdf?src-supplier=Digikey, ComponentLink3URL=http://www.vishay.com/docs/20043/crcwhpe3.pdf?src-supplier=Digikey, Construction=Rectangular, Contact Plating=Tin, Depth=1.25mm, Features="Automotive AEC-Q200", Height=0.5mm, Item Type=Resistor, Lead Free="Lead Free", Length=2mm, Manufacturer Part Number=CRCW080510R0FKEAHP, Military Standard=Not, Number of Terminations=2, Packaging="Tape and Reel", Pricing="1=0.19, 10=0.066, 50=0.066, 100=0.04, 1000=0.027, 10000=0.023 (USD)", Radiation Hardening=No, Reach SVHC Compliant=Unknown, RoHS=Yes, RoHS Compliant=Yes, Series=CRCW-HP, Stock=384044, Supplier=Mouser, Technology="THICK FILM", Termination=SMD/SMT, Tolerance=1%, Voltage Rating (DC)=150V, Weight=0.000194oz, Width=1.2mm
R3 R7 R8 R11: library part RC1206FR-073M3L, "RES 3.3M OHM 1% 1/4W 1206", LCSC Part Number=C137288, Manufacturer=Yageo, Voltage Rating (AC)=200V, ComponentLink1Description=https://datasheet.ciiva.com/11809/0900766b80c6630a-11809505.pdf?src-supplier=Rs, ComponentLink1URL=https://datasheet.ciiva.com/11809/0900766b80c6630a-11809505.pdf?src-supplier=Rs, ComponentLink2Description=https://datasheet.ciiva.com/2511/pyu-rc1206-51-rohs-l-4-2511094.pdf?src-supplier=Digikey, ComponentLink2URL=https://datasheet.ciiva.com/2511/pyu-rc1206-51-rohs-l-4-2511094.pdf?src-supplier=Digikey, ComponentLink3Description=https://datasheet.ciiva.com/2511/pyu-rc1206-51-rohs-l-4-2511095.pdf?src-supplier=Digikey, ComponentLink3URL=https://datasheet.ciiva.com/2511/pyu-rc1206-51-rohs-l-4-2511095.pdf?src-supplier=Digikey, ComponentLink4Description=https://datasheet.ciiva.com/2511/pyu-rc1206-51-rohs-l-4-2511096.pdf?src-supplier=Digikey, ComponentLink4URL=https://datasheet.ciiva.com/2511/pyu-rc1206-51-rohs-l-4-2511096.pdf?src-supplier=Digikey, ComponentLink5Description=https://datasheet.ciiva.com/17420/pyu-rc1206-51-rohs-l-4-17420140.pdf?src-supplier=Future+Electronics, ComponentLink5URL=https://datasheet.ciiva.com/17420/pyu-rc1206-51-rohs-l-4-17420140.pdf?src-supplier=Future+Electronics, Item Type=Resistor, Manufacturer Part Number=RC1206FR-073M3L, Pricing="5000=0.0038, 20000=0.0036, 75000=0.0034, 200000=0.0032, 500000=0.003 (USD)", RoHS=Yes, Stock=130000, Supplier="Future Electronics"
R5: library part CRCW06031R00FKEA, "RES SMD 1 OHM 1% 1/10W 0603", Case Code (Imperial)=0603, Case Code (Metric)=1608, LCSC Part Number=C844752, Manufacturer="Vishay Dale", Max Operating Temperature=155°C, Max Power Dissipation=100mW, Min Operating Temperature=-55°C, Package Quantity=5000, Ratings=AEC-Q200, Resistance Tolerance=1%, Resistor Type="Thick Film", Temperature Coefficient=100ppm/°C, Voltage Rating=75V, Case/Package=0603, ComponentLink1Description=https://datasheet.ciiva.com/7792/1359337-7792119.pdf?src-supplier=Element14, ComponentLink1URL=https://datasheet.ciiva.com/7792/1359337-7792119.pdf?src-supplier=Element14, ComponentLink2Description=https://datasheet.ciiva.com/3257/dcrcwe3-3257225.pdf?src-supplier=Avnet, ComponentLink2URL=https://datasheet.ciiva.com/3257/dcrcwe3-3257225.pdf?src-supplier=Avnet, ComponentLink3Description=https://datasheet.ciiva.com/2465/dcrcwe3-2465530.pdf?src-supplier=Digikey, ComponentLink3URL=https://datasheet.ciiva.com/2465/dcrcwe3-2465530.pdf?src-supplier=Digikey, ComponentLink4Description=https://datasheet.ciiva.com/2465/dcrcwe3-2465528.pdf?src-supplier=Digikey, ComponentLink4URL=https://datasheet.ciiva.com/2465/dcrcwe3-2465528.pdf?src-supplier=Digikey, ComponentLink5Description=https://datasheet.ciiva.com/5541/dcrcwe3-109170-5541726.pdf?src-supplier=Mouser, ComponentLink5URL=https://datasheet.ciiva.com/5541/dcrcwe3-109170-5541726.pdf?src-supplier=Mouser, Construction=Rectangular, Contact Plating=Tin, Depth=0.85mm, Features="Automotive AEC-Q200", Height=0.45mm, Item Type=Resistor, Lead Free=5697LeadFree, Length=1.55mm, Manufacturer Part Number=CRCW06031R00FKEA, Military Standard=Not, Number of Terminations=2, Packaging="Tape and Reel", Pins=2, Power Rating=100mW, Pricing="1=0.1, 10=0.024, 50=0.024, 100=0.014, 1000=0.011, 10000=0.006 (USD)", Radiation Hardening=No, Reach SVHC Compliant=Unknown, RoHS=Yes, RoHS Compliant=Yes, Series=CRCW, Stock=303523, Supplier=Mouser, Termination=SMD/SMT, Tolerance=1%, Voltage Rating (DC)=75V, Weight=7.1E-05oz, Width=0.85mm
R6: library part RC0603FR-0782K5L, "RES 82.5K OHM 1% 1/10W 0603", LCSC Part Number=C185310, Manufacturer=Yageo, Voltage Rating (DC)=50V, ComponentLink1Description=https://datasheet.ciiva.com/2519/pyu-r-int-thick-7-2519111.pdf?src-supplier=Digikey, ComponentLink1URL=https://datasheet.ciiva.com/2519/pyu-r-int-thick-7-2519111.pdf?src-supplier=Digikey, ComponentLink2Description=https://datasheet.ciiva.com/2519/pyu-r-int-thick-7-2519112.pdf?src-supplier=Digikey, ComponentLink2URL=https://datasheet.ciiva.com/2519/pyu-r-int-thick-7-2519112.pdf?src-supplier=Digikey, ComponentLink3Description=https://datasheet.ciiva.com/2519/pyu-r-int-thick-7-2519113.pdf?src-supplier=Digikey, ComponentLink3URL=https://datasheet.ciiva.com/2519/pyu-r-int-thick-7-2519113.pdf?src-supplier=Digikey, Item Type=Resistor, Lead Free=5697LeadFree, Manufacturer Part Number=RC0603FR-0782K5L, Pricing="5000=0.00112 (USD)", RoHS=Yes, Stock=165000, Supplier=Avnet
R9: library part RC0603FR-071ML, "RES SMD 1M OHM 1% 1/10W 0603", Case Code (Imperial)=0603, Case Code (Metric)=1608, LCSC Part Number=C105578, Manufacturer=Yageo, Max Operating Temperature=155°C, Min Operating Temperature=-55°C, Package Quantity=5000, Power Rating=100mW, Resistance=1MR, Supplier Part Number 1=311-1.00MHRDKR-ND, Temperature Coefficient=100ppm/°C, Tolerance=1%, Voltage Rating=50V, Case/Package=0603, ComponentLink1Description=http://www.farnell.com/datasheets/2167052.pdf?src-supplier=Mouser, ComponentLink1URL=http://www.farnell.com/datasheets/2167052.pdf?src-supplier=Mouser, ComponentLink2Description=http://www.farnell.com/datasheets/2167052.pdf?src-supplier=Element14, ComponentLink2URL=http://www.farnell.com/datasheets/2167052.pdf?src-supplier=Element14, ComponentLink3Description=http://documents.rs-components.com/techlib://itc_doclist_GB.htm?stockno=5048956&src-supplier=RSComponents, ComponentLink3URL=http://documents.rs-components.com/techlib://itc_doclist_GB.htm?stockno=5048956&src-supplier=RSComponents, Composition="Thick Film", Depth=0.8mm, Height=0.45mm, Item Type=Resistor, Lead Free="Lead Free", Length=1.6mm, Manufacturer Part Number=RC0603FR-071ML, Military Standard=Not, Number of Pins=2, Packaging="Tape and Reel", Pricing 1="1=0.1, 10=0.023, 100=0.0094, 1000=0.00421, 2500=0.00366 (USD)", REACH SVHC="No SVHC", Stock 1=3824601, Supplier 1=Digi-Key, Termination=SMD/SMT, Voltage Rating (DC)=50V, Width=0.8mm
R10: library part RC0603FR-0724K3L, "RES 24.3K OHM 1% 1/10W 0603", Manufacturer=Yageo, Supplier Part Number=6938161, Voltage Rating (DC)=50V, ComponentLink1Description=https://datasheet.ciiva.com/15189/getdatasheetpartid-326710-15189669.pdf?src-supplier=Verical, ComponentLink1URL=https://datasheet.ciiva.com/15189/getdatasheetpartid-326710-15189669.pdf?src-supplier=Verical, Item Type=Resistors, Lead Free=5697LeadFree, Manufacturer Part Number=RC0603FR-0724K3L, Pricing="5000=0.0015, 50000=0.0014, 150000=0.0014, 375000=0.0013, 1000000=0.0012 (USD)", RoHS=Yes, Stock=440000, Supplier="Future Electronics"
R12: library part RC0603FR-073KL, "RES 3K OHM 1% 1/10W 0603", Case Code (Imperial)=0603, Case Code (Metric)=1608, LCSC Part Number=C126358, Manufacturer=Yageo, Max Operating Temperature=155°C, Max Power Dissipation=100mW, Min Operating Temperature=-55°C, Resistance Tolerance=1%, Resistor Type="Thick Film", Temperature Coefficient=100ppm/°C, Voltage Rating=50V, Case/Package=0603, ComponentLink1Description=http://www.farnell.com/datasheets/2167052.pdf?src-supplier=Farnell, ComponentLink1URL=http://www.farnell.com/datasheets/2167052.pdf?src-supplier=Farnell, ComponentLink2Description=http://www.mouser.com/ds/2/447/RC0603-272842.pdf?src-supplier=Mouser, ComponentLink2URL=http://www.mouser.com/ds/2/447/RC0603-272842.pdf?src-supplier=Mouser, ComponentLink3Description=https://www.verical.com/server-webapp/html/getDatasheet?partID=135099&src-supplier=Verical, ComponentLink3URL=https://www.verical.com/server-webapp/html/getDatasheet?partID=135099&src-supplier=Verical, ComponentLink4Description=http://www.farnell.com/datasheets/2167052.pdf?src-supplier=Element14, ComponentLink4URL=http://www.farnell.com/datasheets/2167052.pdf?src-supplier=Element14, ComponentLink5Description=http://www.yageo.com/documents/recent/PYu-RC_Group_51_RoHS_L_10.pdf?src-supplier=Digikey, ComponentLink5URL=http://www.yageo.com/documents/recent/PYu-RC_Group_51_RoHS_L_10.pdf?src-supplier=Digikey, ComponentLink6Description=http://www.yageo.com/documents/recent/PYu-RC_Group_51_RoHS_L_9.pdf?src-supplier=Digikey, ComponentLink6URL=http://www.yageo.com/documents/recent/PYu-RC_Group_51_RoHS_L_9.pdf?src-supplier=Digikey, ComponentLink7Description=https://datasheet.octopart.com/RC0603FR-073KL-Yageo-datasheet-8328172.pdf?src-supplier=Farnell, ComponentLink7URL=https://datasheet.octopart.com/RC0603FR-073KL-Yageo-datasheet-8328172.pdf?src-supplier=Farnell, ComponentLink8Description=http://www.yageo.com/documents/recent/PYu-RC0603_51_RoHS_L_7.pdf?src-supplier=Future+Electronics, ComponentLink8URL=http://www.yageo.com/documents/recent/PYu-RC0603_51_RoHS_L_7.pdf?src-supplier=Future+Electronics, ComponentLink9Description=https://datasheet.octopart.com/RC0603FR-073KL-Yageo-datasheet-34211833.pdf?src-supplier=Element14, ComponentLink9URL=https://datasheet.octopart.com/RC0603FR-073KL-Yageo-datasheet-34211833.pdf?src-supplier=Element14, ComponentLink10Description=http://www.farnell.com/datasheets/1868787.pdf?src-supplier=Newark, ComponentLink10URL=http://www.farnell.com/datasheets/1868787.pdf?src-supplier=Newark, ComponentLink11Description=https://datasheet.octopart.com/RC0603FR-073KL-Yageo-datasheet-164759695.pdf?src-supplier=Future+Electronics, ComponentLink11URL=https://datasheet.octopart.com/RC0603FR-073KL-Yageo-datasheet-164759695.pdf?src-supplier=Future+Electronics, Construction=Rectangular, Depth=0.8mm, Features="Moisture Resistant", Item Type=Resistor, Lead Free=5697LeadFree, Length=1.6mm, Manufacturer Part Number=RC0603FR-073KL, Military Standard=Not, Number of Terminations=2, Packaging="Tape and Reel", Pins=2NUMBER, Power Rating=100mW, Reach SVHC Compliant=No, RoHS=Yes, RoHS Compliant=Yes, Series=RC, Supplier=Avnet, Termination=SMD/SMT, Tolerance=1%, Voltage Rating (DC)=50V, Width=800um
R13 R14 R15 R16: library part CSR1206FTR100, "Res Thick Film 1206 0.1 Ohm 1% 1/2W ±100ppm/°C Molded SMD SMD Paper T/R", Case Code (Imperial)=1206, Case Code (Metric)=3216, LCSC Part Number=C346763, Manufacturer="Stackpole Electronics", Max Operating Temperature=155°C, Max Power Dissipation=500mW, Min Operating Temperature=-55°C, Package Quantity=1, Temperature Coefficient=100ppm/°C, Tolerance=1%, Case/Package=1206, ComponentLink1Description=https://datasheet.ciiva.com/26835/getdatasheetpartid-743581-26835493.pdf?src-supplier=Verical, ComponentLink1URL=https://datasheet.ciiva.com/26835/getdatasheetpartid-743581-26835493.pdf?src-supplier=Verical, Construction=Rectangular, Contact Plating=Tin,Matte, Depth=1.55mm, Height=0.026inch, Item Type=Resistor, Lead Free="Lead Free", Length=0.12inch, Manufacturer Part Number=CSR1206FTR100, Military Standard=Not, Mounting Technology="Surface Mount", Number of Terminations=2, Packaging="Tape and Reel", Pricing="1=0.36, 10=0.265, 25=0.212, 50=0.1576, 100=0.1111, 250=0.09896, 500=0.08484, 1000=0.06464 (USD)", Radiation Hardening=No, RoHS=Yes, RoHS Compliant=Yes, Series=CSR, Stock=291710, Supplier=Digikey, Width=0.061inch
R17: library part CRCW0603100KFKEA, "RES SMD 100K OHM 1% 1/10W 0603", Case Code (Imperial)=0603, Case Code (Metric)=1608, Case/Package=345Case, LCSC Part Number=C844916, Max Operating Temperature=155°C, Min Operating Temperature=-55°C, Power Rating=100mW, Resistance Tolerance=1%, Resistor Type="Thick Film", Supplier Part Number=71-CRCW0603-100K-E3, Temperature Coefficient=100ppm/°C, Voltage Rating=75V, Category="Chip SMD Resistors", ComponentLink1Description=LCSC, ComponentLink2Description=http://www.farnell.com/datasheets/2310790.pdf?src-supplier=Farnell, ComponentLink2URL=http://www.farnell.com/datasheets/2310790.pdf?src-supplier=Farnell, ComponentLink3Description=https://datasheet.octopart.com/CRCW0603100KFKEA-Vishay-datasheet-14722531.pdf?src-supplier=Newark, ComponentLink3URL=https://datasheet.octopart.com/CRCW0603100KFKEA-Vishay-datasheet-14722531.pdf?src-supplier=Newark, ComponentLink4Description=https://www.vishay.com/docs/20035/dcrcwe3.pdf?src-supplier=Digi-Key, ComponentLink4URL=https://www.vishay.com/docs/20035/dcrcwe3.pdf?src-supplier=Digi-Key, ComponentLink5Description=https://datasheet.octopart.com/CRCW0603100KFKEA-Vishay-datasheet-5300368.pdf?src-supplier=Future+Electronics, ComponentLink5URL=https://datasheet.octopart.com/CRCW0603100KFKEA-Vishay-datasheet-5300368.pdf?src-supplier=Future+Electronics, ComponentLink6Description=http://www.farnell.com/datasheets/2310790.pdf?src-supplier=Newark, ComponentLink6URL=http://www.farnell.com/datasheets/2310790.pdf?src-supplier=Newark, ComponentLink7Description=http://www.farnell.com/datasheets/2310790.pdf?src-supplier=Element14, ComponentLink7URL=http://www.farnell.com/datasheets/2310790.pdf?src-supplier=Element14, ComponentLink8Description=https://datasheet.octopart.com/CRCW0603100KFKEA-Vishay-datasheet-83961561.pdf?src-supplier=Element14, ComponentLink8URL=https://datasheet.octopart.com/CRCW0603100KFKEA-Vishay-datasheet-83961561.pdf?src-supplier=Element14, ComponentLink9Description=https://datasheet.octopart.com/CRCW0603100KFKEA-Vishay-datasheet-8363642.pdf?src-supplier=Verical, ComponentLink9URL=https://datasheet.octopart.com/CRCW0603100KFKEA-Vishay-datasheet-8363642.pdf?src-supplier=Verical, ComponentLink10Description=https://datasheet.octopart.com/CRCW0603100KFKEA-Vishay-datasheet-508714.pdf?src-supplier=Farnell, ComponentLink10URL=https://datasheet.octopart.com/CRCW0603100KFKEA-Vishay-datasheet-508714.pdf?src-supplier=Farnell, ComponentLink11Description=https://datasheet.octopart.com/CRCW0603100KFKEA-Vishay-datasheet-17834126.pdf?src-supplier=TME, ComponentLink11URL=https://datasheet.octopart.com/CRCW0603100KFKEA-Vishay-datasheet-17834126.pdf?src-supplier=TME, Features=6309FeaturesType, Height=500um, Item Type=Resistor, Lead Free=5697LeadFree, Packaging=13Packaging, Pins=2NUMBER, Pricing="1=0.1, 10=0.019, 50=0.019, 100=0.009, 1000=0.007, 10000=0.004 (USD)", RoHS=Yes, RoHS Compliant=Yes, Stock=716604, Supplier=Mouser, Tolerance=1%, Voltage Rating (DC)=75V